# Altium PCB eZlo_Radar.PcbDoc
Units mm, origin at the board's own origin, x right, y up, seen from the top; angles counter-clockwise.
Board outline 38 x 11.5 mm, 4 copper layers (Top Layer, Power, GND, Bottom Layer), stack 1.626 mm thick; 37 components, 24 nets, 151 pads, 70 vias.
Unrouted connection lines stored in the file: 7.
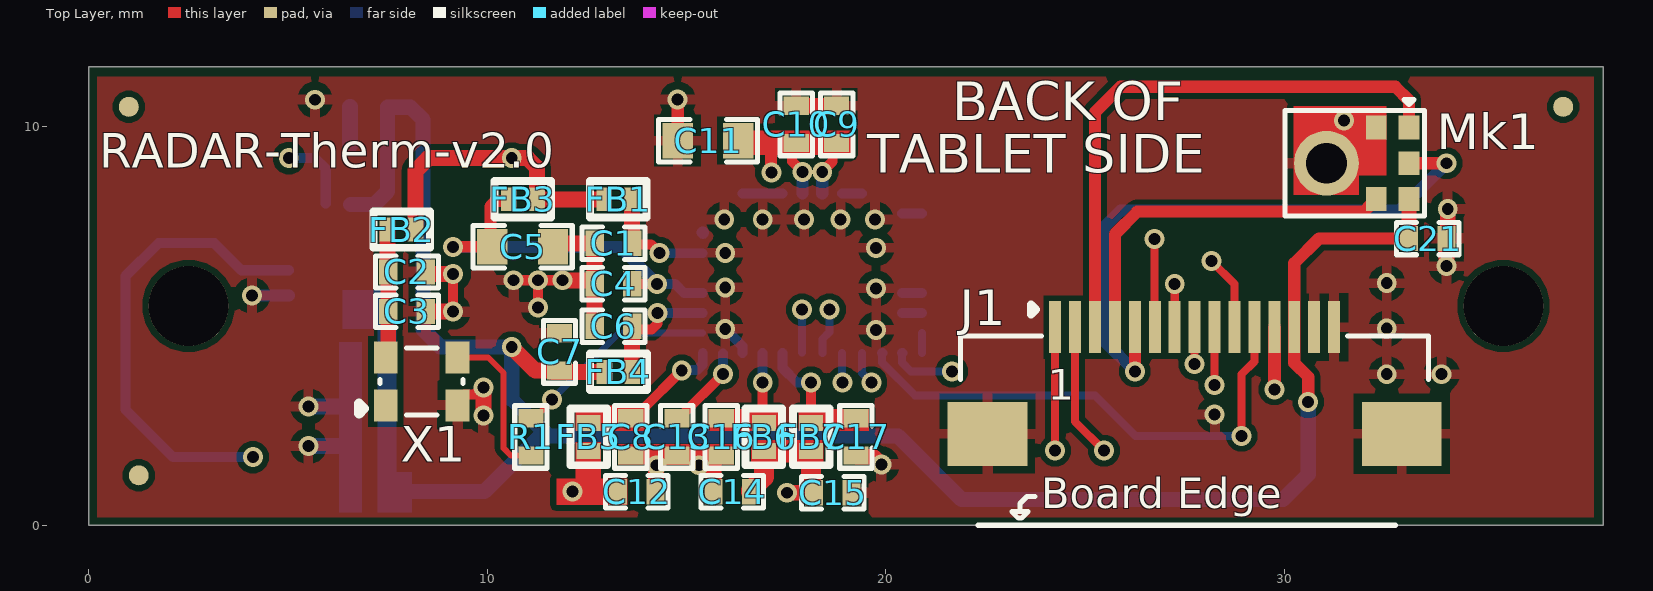
[diagram p0: Top Layer view]
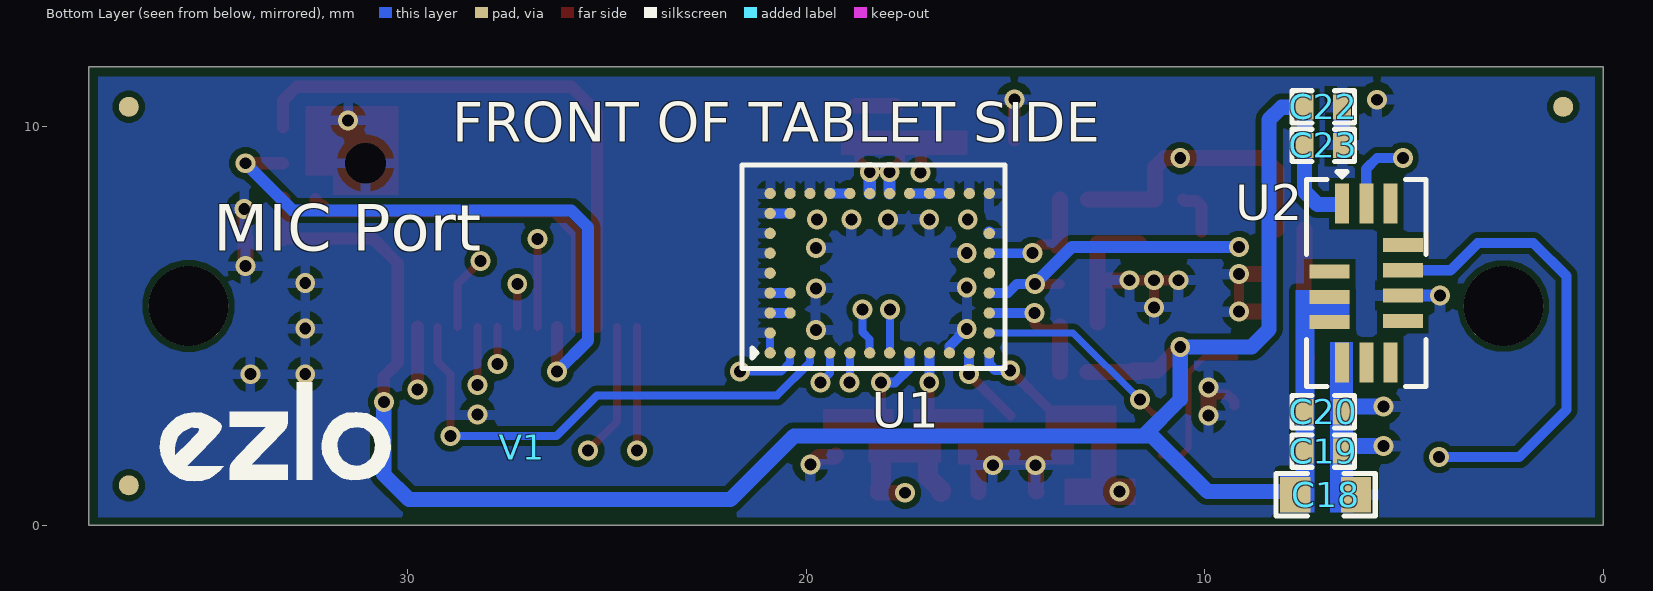
[diagram p1: Bottom Layer view, seen from below]
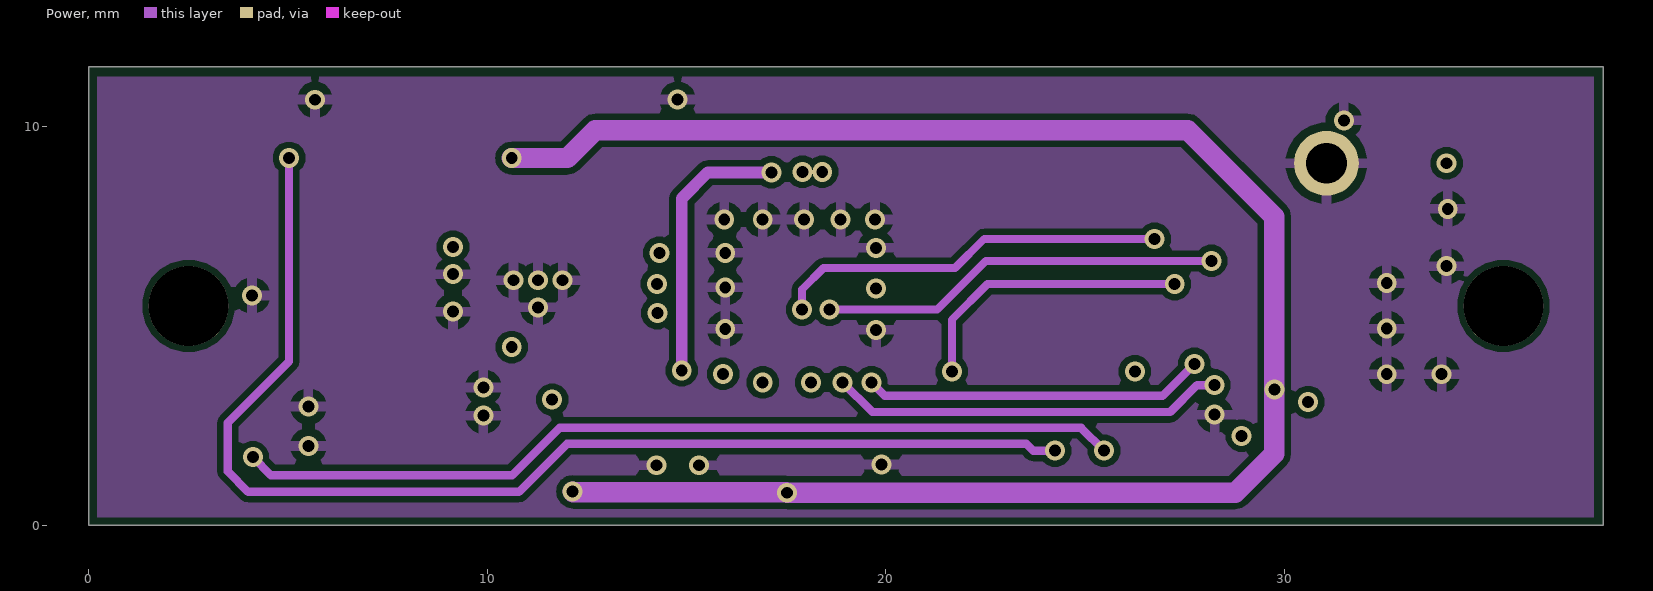
[diagram p2: Power]
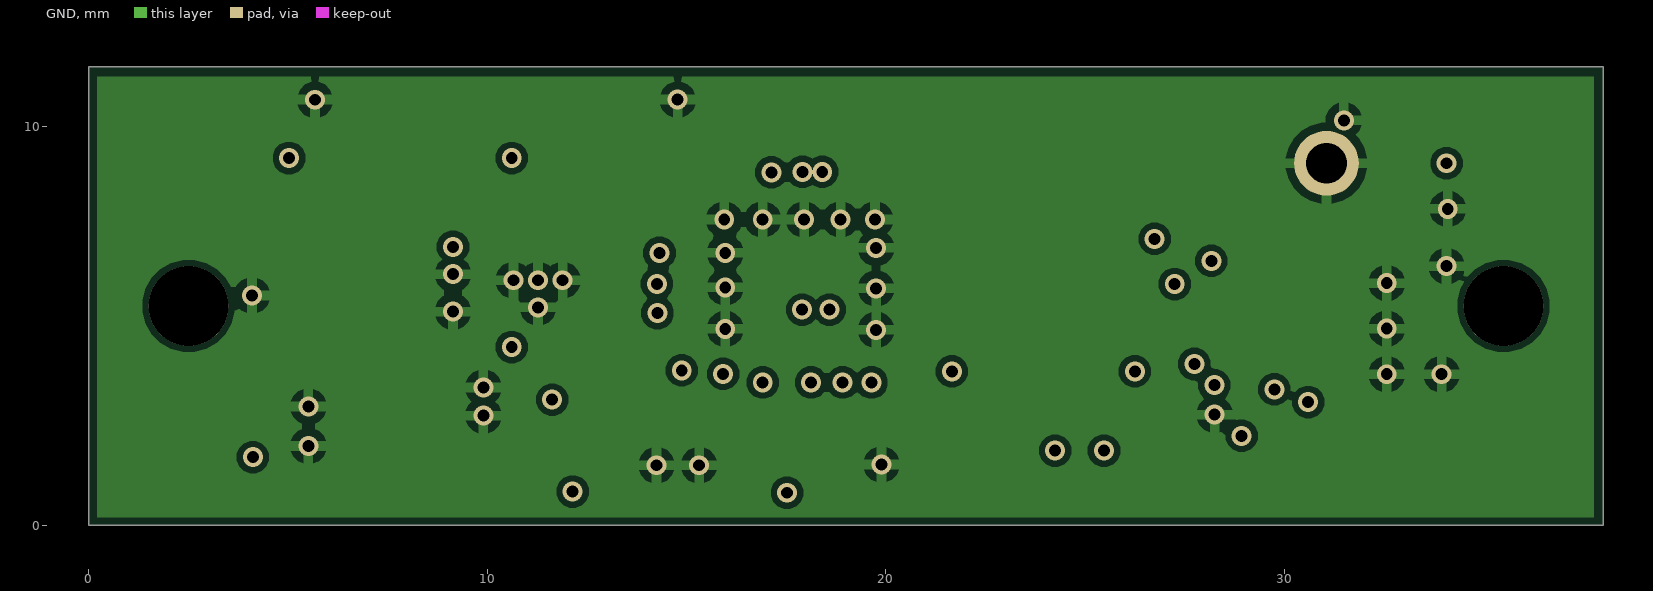
[diagram p3: GND]
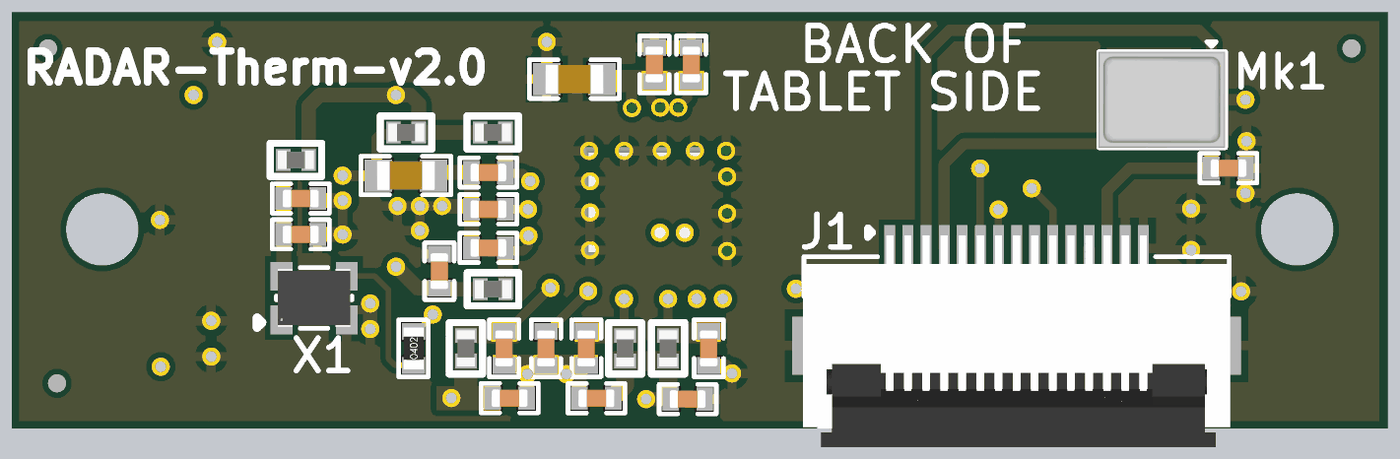
[diagram p4: 3D render of the assembled board from above, using the file's embedded part models]
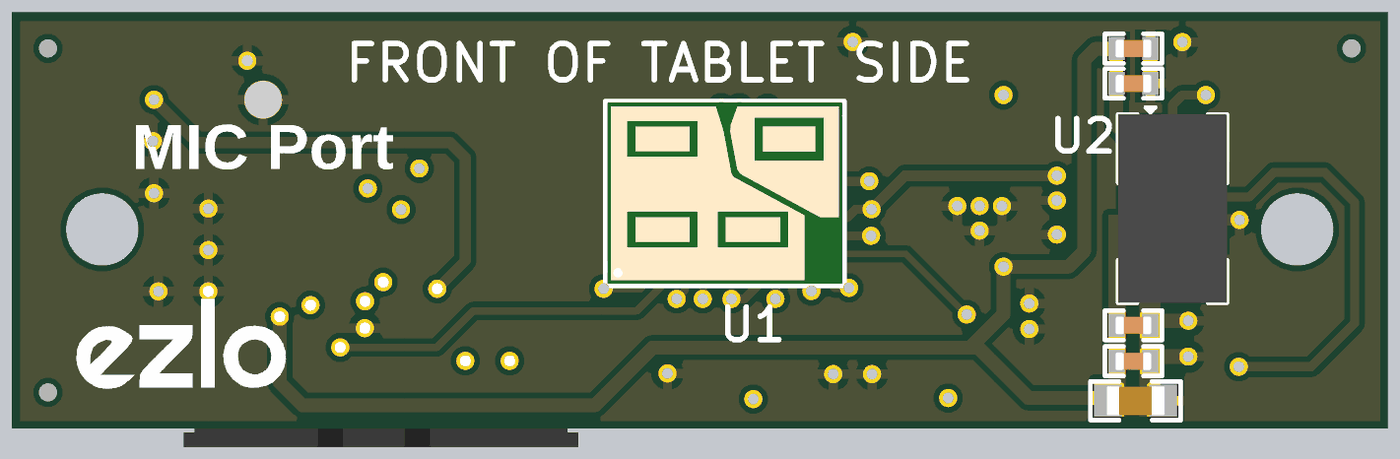
[diagram p5: 3D render of the assembled board from below, using the file's embedded part models]

## Layer stack, top to bottom
Top Solder: solder mask 0.01, Solder Resist, Dk 3.3
Top Layer: signal copper 0.035
Dielectric 2: prepreg 0.2104, PP-006, Dk 4.6
Power: signal copper 0.035
Dielectric 1: core 1.065, FR-4, Dk 4.6
GND: signal copper 0.035
Dielectric 3: prepreg 0.2104, PP-006, Dk 4.6
Bottom Layer: signal copper 0.035
Bottom Solder: solder mask 0.01, Solder Resist, Dk 3.3

## Board outline
0,0 0,11.5 38,11.5 38,0

## Design rules (kind name [scope] priority, off if disabled: settings)
Clearance [All] p1: gap=0.152 ignorepadtopadclearanceinfootprint=FALSE except(0.102: Arc-SMDPad Track-SMDPad SMDPad-SMDPad)
ComponentClearance [All] p1: gap=0 collisioncheckmode=3 verticalgap=0 showdistances=FALSE
HoleSize [All] p1: absolutevalues=TRUE maxlimit=25.4 minlimit=0.025 maxpercent=80.000 minpercent=20.000
HoleToHoleClearance [All] p1: gap=0 allowstackedmicrovias=TRUE
MinimumSolderMaskSliver [All] p1: minsoldermaskwidth=0
PlaneConnect [All] p1: planeconnectstyle=Direct reliefexpansion=0.508 reliefentries=4 reliefconductorwidth=0.254 reliefairgap=0.254
PolygonConnect [All] p1: connectstyle=Relief reliefconductorwidth=0.254 reliefentries=4 polygonreliefangle="90 Angle" airgapwidth=0.203
RoutingVias [All] p1: holewidth=0.3 width=0.6 viastyle="Through Hole" minholewidth=0.2 minwidth=0.45 maxholewidth=0.3 maxwidth=0.6
SilkToSilkClearance [All] p1: silktosilkclearance=0
SilkToSolderMaskClearance [IsPad] p1: minsilkscreentomaskgap=0 clearancetoexposedcopper=TRUE
SolderMaskExpansion [All] p1: expansion=0 istentingtop=FALSE soldermaskfromhole=TRUE
Width [All] p1: maxlimit=0.508 minlimit=0.1 preferedwidth=0.4 minimp=50.000000 maximp=50.000000 favimp=50.000000
23 further rules are at their usual default settings.

## Classes and differential pairs
component class Radar-Sensor: C1 C2 C3 C4 C5 C6 C7 C8 C9 C10 C11 C12 C13 C14 C15 C16 C17 C18 C19 C20 C21 C22 C23 FB1 FB2 FB3 FB4 FB5 FB6 FB7 J1 Mk1 R1 U1 X1

## Components (designator, comment, footprint, x,y, rotation, side; value= is the part's Value field where it differs from the comment)
C1 "1uF" Cap-0402 13.163,7.074 r180 top locked
C2 "1uF" Cap-0402 7.982,6.354 r180 top locked
C3 "10nF" Cap-0402 7.982,5.363 r180 top locked
C4 "1uF" Cap-0402 13.163,6.058 r180 top locked
C5 "22uF" Cap-0603 10.886,6.989 r0 top locked
C6 "1uF" Cap-0402 13.163,4.991 r180 top locked
C7 "10uF" Cap-0402 11.81,4.349 r90 top locked
C8 "1uF" Cap-0402 13.598,2.215 r270 top locked
C9 "1uF" Cap-0402 18.764,10.058 r90 top locked
C10 "1uF" Cap-0402 17.748,10.058 r90 top locked
C11 "22uF" Cap-0603 15.538,9.652 r180 top locked
C12 "10uF" Cap-0402 13.749,0.84 r0 top locked
C13 "0.47uF" Cap-0402 14.756,2.215 r270 top locked
C14 "10uF" Cap-0402 16.146,0.837 r180 top locked
C15 "10uF" Cap-0402 18.666,0.814 r0 top locked
C16 "0.1uF" Cap-0402 15.868,2.215 r270 top locked
C17 "1uF" Cap-0402 19.249,2.215 r270 top locked
C18 "22uF" Cap-0603 6.962,0.767 r0 bottom
C19 "10uF" Cap-0402 7.022,1.86 r0 bottom
C20 "0.1uF" Cap-0402 7.022,2.85 r0 bottom
C21 "0.1uF" Cap-0402 33.602,7.194 r0 top locked
C22 "1uF" Cap-0402 7.022,10.496 r180 bottom locked
C23 "0.1uF" Cap-0402 7.022,9.53 r180 bottom locked
FB1 "100MHz" IND-0402 13.283,8.179 r180 top locked
FB2 "100MHz" IND-0402 7.847,7.42 r180 top locked
FB3 "100MHz" IND-0402 10.89,8.179 r0 top locked
FB4 "100MHz" IND-0402 13.29,3.848 r180 top locked
FB5 "100MHz" IND-0402 12.541,2.215 r270 top locked
FB6 "100MHz" IND-0402 16.939,2.215 r270 top locked
FB7 "100MHz" IND-0402 18.125,2.215 r270 top locked
J1 "AFC01-S15FCC-00" AFC01-S15FCC-00 27.75,3.63 r0 top locked
Mk1 "ICS-43434" ICS-43434 31.76,9.084 r270 top locked
R1 "150R" Res-0402 11.093,2.215 r90 top locked
U1 "BGT60TR13CE6327XUMA1" pg-vf2bga-40 18.154,6.325 r180 bottom locked
U2 "PAJ7620U2" PAJ7620U2 5.942,6.076 r90 bottom
V1 "EZLO_LOGO" "Logo Ezlo_S" 27.126,1.961 r0 bottom locked
X1 "80MHz" KC2016K 8.35,3.607 r0 top locked

## Footprints (in the part's own frame and the unit in brackets; to place one, negate y for a bottom-side part, rotate by r counter-clockwise, add the part's x,y. Pads: shape width x height; smd on the part's side, far side on the other; paste and mask are expansions set on the pad)
AFC01-S15FCC-00 [mm]
  rect 0.3x1.3 smd: 1(-3.5,1.34) 2(-3,1.34) 3(-2.5,1.34) 4(-2,1.34) 5(-1.5,1.34) 6(-1,1.34) 7(-0.5,1.34) 8(0,1.34) 9(0.5,1.34) 10(1,1.34) 11(1.5,1.34) 12(2,1.34) 13(2.5,1.34) 14(3,1.34) 15(3.5,1.34)
  rect 2x1.6 smd: MP1(-5.2,-1.34) MP2(5.2,-1.34)
  silkscreen extent -5.87,-3.63 5.87,1.91, body extent -5.9,-4.14 5.9,1.71, height 2.11
Cap-0402 [mil]
  rect 18x25 smd mask+2.36: 1(-18.5,0) 2(18.5,0)
  silkscreen extent -31,-16 31,16, body extent -20,-10 20,10, height 19
Cap-0603 [mil]
  rect 30x35 smd mask+2.36: 1(-30,0) 2(30,0)
  silkscreen extent -49,-21 49,21, body extent -32,-16 31,16, height 34
ICS-43434 [mm]
  rect 0.6x0.522 smd paste-0.05: 1(-0.9,1.372) 2(-0.9,0.55) 4(0.9,0.55) 5(0.9,1.372) 6(0,1.372)
  rect 0.1x0.1 smd paste-1 mask+0: 3(-0.015,-1.372)
  round 1.625 / inner round 1.625 / far side round 0 hole 1.025: 3(0,-0.702)
  silkscreen extent -1.6,-1.74 1.33,1.76, body extent -1.33,-1.75 1.33,1.75, height 0.98
IND-0402 [mm]
  rect 0.4x0.6 smd: 1(-0.35,0) 2(0.35,0)
  silkscreen extent -0.71,-0.46 0.71,0.46, body extent -0.5,-0.25 0.5,0.25, height 0.25
KC2016K [mm]
  rect 0.6x0.8 smd: 1(-0.9,-0.6) 2(0.9,-0.6) 3(0.9,0.6) 4(-0.9,0.6)
  silkscreen extent -1.57,-0.84 1.04,0.84, body extent -1,-0.8 1,0.8, height 0.81
"Logo Ezlo_S" [mm]
  silkscreen extent 3.3,-1.62 9.09,0.86
PAJ7620U2 [mm]
  rect 1x0.352 smd: 1(1.994,0.61) 2(1.994,0) 3(1.994,-0.61) 8(-1.994,-0.61) 9(-1.994,0) 10(-1.994,0.61)
  rect 0.352x1 smd: 4(0.957,-0.92) 5(0.322,-0.92) 6(-0.313,-0.92) 7(-0.948,-0.92) 11(-0.983,0.92) 12(-0.348,0.92) 13(0.287,0.92)
  silkscreen extent -2.6,-1.5 2.79,1.5, body extent -2.6,-1.5 2.6,1.5, height 1.92
pg-vf2bga-40 [mm]
  round 0.285 smd: A1(-2.75,-2) A2(-2.75,-1.5) A3(-2.75,-1) A4(-2.75,-0.5) A5(-2.75,0) A6(-2.75,0.5) A7(-2.75,1) A8(-2.75,1.5) A9(-2.75,2) B1(-2.25,-2) B3(-2.25,-1) B4(-2.25,-0.5) B8(-2.25,1.5) B9(-2.25,2) C1(-1.75,-2) C9(-1.75,2) D1(-1.25,-2) D9(-1.25,2) E1(-0.75,-2) E9(-0.75,2) F1(-0.25,-2) F9(-0.25,2) G1(0.25,-2) G9(0.25,2) H1(0.75,-2) H9(0.75,2) J1(1.25,-2) J9(1.25,2) K1(1.75,-2) K9(1.75,2) L1(2.25,-2) L9(2.25,2) M1(2.75,-2) M2(2.75,-1.5) M3(2.75,-1) M4(2.75,-0.5) M5(2.75,0) M6(2.75,0.5) M7(2.75,1) M9(2.75,2)
  silkscreen extent -3.45,-2.39 3.15,2.72, body extent -3.4,-2.32 3.1,2.68, height 0.9
Res-0402 [mil]
  rect 18x25 smd mask+2.17: 1(-18.5,0) 2(18.5,0)
  silkscreen extent -32,-17 32,16, body extent -23,-11 23,11, height 16

## Part data
C1 C2 C4 C6 C8 C9 C10 C17 C22: library part CC0402KRX5R6BB105, "CAP CER 1UF 10V X5R 0402", Case Code (Imperial)=0402, Case Code (Metric)=1005, Dielectric=X5R, LCSC Part Number=C106254, Manufacturer=Yageo, Max Operating Temperature=85°C, Min Operating Temperature=-55°C, Package Quantity=1, Resistor Type=Ceramic, Supplier Part Number 1=603-CC402KRX5R6BB105, Tolerance=10%, Voltage Rating=10V, Capacitance=1uF, Case/Package=0402, Category="Ceramic Capacitors", ComponentLink1Description=https://datasheet.ciiva.com/176/upy-gphc-x5r-4v-to-50v-12-176704.pdf?src-supplier=Digi-Key, ComponentLink1URL=https://datasheet.ciiva.com/176/upy-gphc-x5r-4v-to-50v-12-176704.pdf?src-supplier=Digi-Key, ComponentLink2Description=https://datasheet.ciiva.com/176/mlccorderingcode-176705.pdf?src-supplier=Digi-Key, ComponentLink2URL=https://datasheet.ciiva.com/176/mlccorderingcode-176705.pdf?src-supplier=Digi-Key, ComponentLink3Description=https://datasheet.ciiva.com/176/mlccorderingcode-176706.pdf?src-supplier=Digi-Key, ComponentLink3URL=https://datasheet.ciiva.com/176/mlccorderingcode-176706.pdf?src-supplier=Digi-Key, Construction=Flat, Depth=0.5mm, Dissipation Factor=15%, Halogen Free="Halogen Free", Height=0.5mm, Lead Free="Lead Free", Length=1mm, Manufacturer Part Number=CC0402KRX5R6BB105, Mount="Surface Mount", Number of Pins=2, Packaging="Tape and Reel", Pricing 1="1=0.11000, 10=0.05500, 50=0.05500, 100=0.03300, 500=0.02700, 1000=0.02200, 2500=0.02100, 10000=0.01800 (USD)", Radiation Hardening=No, REACH SVHC="No SVHC", RoHS=Yes, RoHS Compliant=Yes, Series=CC, Stock 1=6711367, Supplier 1=Mouser, Termination=SMD/SMT, Thickness=0.022inch, Voltage Rating (DC)=10V, Width=0.02inch
C3: library part CC0402KRX7R8BB103, "CAP CER 10000PF 25V X7R 0402", Case Code (Imperial)=0402, Case Code (Metric)=1005, Dielectric=X7R, LCSC Part Number=C327025, Manufacturer=Yageo, Max Operating Temperature=125°C, Min Operating Temperature=-55°C, Package Quantity=1, Supplier Part Number 1=311-1337-1-ND, Tolerance=10%, Voltage Rating=25V, Capacitance=10nF, Case/Package=0402, ComponentLink1Description=http://www.yageo.com/documents/recent/UPY-GPHC_X7R_6.3V-to-50V_18.pdf?src-supplier=Digi-Key, ComponentLink1URL=http://www.yageo.com/documents/recent/UPY-GPHC_X7R_6.3V-to-50V_18.pdf?src-supplier=Digi-Key, ComponentLink2Description=https://www.verical.com/server-webapp/html/getDatasheet?partID=375418&src-supplier=Verical, ComponentLink2URL=https://www.verical.com/server-webapp/html/getDatasheet?partID=375418&src-supplier=Verical, ComponentLink3Description=http://www.yageo.com/documents/recent/UPY-GPHC_X7R_6.3V-to-50V_8.pdf?src-supplier=Avnet, ComponentLink3URL=http://www.yageo.com/documents/recent/UPY-GPHC_X7R_6.3V-to-50V_8.pdf?src-supplier=Avnet, ComponentLink4Description=https://4donline.ihs.com/images/VipMasterIC/IC/YAGO/YAGO-S-A0003557223/YAGO-S-A0003557223-1.pdf?hkey=52A5661711E402568146F3353EA87419&src-supplier=Element14, ComponentLink4URL=https://4donline.ihs.com/images/VipMasterIC/IC/YAGO/YAGO-S-A0003557223/YAGO-S-A0003557223-1.pdf?hkey=52A5661711E402568146F3353EA87419&src-supplier=Element14, ComponentLink5Description=http://www.farnell.com/datasheets/2167236.pdf?src-supplier=Element14, ComponentLink5URL=http://www.farnell.com/datasheets/2167236.pdf?src-supplier=Element14, ComponentLink6Description=http://www.mouser.com/ds/2/447/Yageo_UPY-GP_NP0_16V-to-50V_9-358835.pdf?src-supplier=Mouser, ComponentLink6URL=http://www.mouser.com/ds/2/447/Yageo_UPY-GP_NP0_16V-to-50V_9-358835.pdf?src-supplier=Mouser, Composition=Ceramic, Depth=0.5mm, Halogen Free="Halogen Free", Height=0.5mm, Lead Free="Lead Free", Length=1mm, Manufacturer Part Number=CC0402KRX7R8BB103, Mount="Surface Mount", Packaging="Tape and Reel", Pricing 1="1=0.1, 10=0.021, 100=0.0093, 500=0.00666, 1000=0.00523, 2500=0.00476, 5000=0.00438 (USD)", Radiation Hardening=No, REACH SVHC=Unknown, Stock 1=0, Supplier 1=Digi-Key, Termination=SMD/SMT, Thickness=0.022inch, Voltage Rating (DC)=25V, Width=0.02inch
C5 C11 C18: library part CC0603MRX5R6BB226, "CAP CER 22UF 10V X5R 0603", Case Code (Imperial)=0603, Case Code (Metric)=1608, Dielectric=X5R, LCSC Part Number=C109447, Manufacturer=Yageo, Max Operating Temperature=85°C, Min Operating Temperature=-55°C, Package Quantity=4000, Supplier Part Number 1=311-1819-1-ND, Tolerance=20%, Voltage Rating=10V, Capacitance=22uF, Case/Package=0603, Category="Ceramic Capacitors", ComponentLink1Description=http://www.mouser.com/ds/2/447/Yageo_UPY-GP_NP0_16V-to-50V_9-358835.pdf?src-supplier=Mouser, ComponentLink1URL=http://www.mouser.com/ds/2/447/Yageo_UPY-GP_NP0_16V-to-50V_9-358835.pdf?src-supplier=Mouser, ComponentLink2Description=http://www.yageo.com/documents/recent/UPY-GPHC_X5R_4V-to-50V_25.pdf?src-supplier=Digi-Key, ComponentLink2URL=http://www.yageo.com/documents/recent/UPY-GPHC_X5R_4V-to-50V_25.pdf?src-supplier=Digi-Key, Halogen Free="Halogen Free", Height=0.8mm, Lead Free="Lead Free", Length=0.063inch, Manufacturer Part Number=CC0603MRX5R6BB226, Mount="Surface Mount", Packaging="Tape and Reel", Pricing 1="1=0.68000, 10=0.48000, 50=0.36300, 100=0.31610, 500=0.23416, 1000=0.19903 (USD)", RoHS=Yes, RoHS Compliant=Yes, Stock 1=19628, Supplier 1=Digi-Key, Termination=SMD/SMT, Thickness=0.035inch, Voltage Rating (DC)=10V, Weight=7.1E-05oz, Width=0.8mm
C7 C12 C14 C15 C19: library part CL05A106MP5NUNC, "CAP CER 10UF 10V X5R 0402", Case Code (Imperial)=0402, Case Code (Metric)=1005, Dielectric=X5R, LCSC Part Number=C315248, Manufacturer=Samsung, Max Operating Temperature=85°C, Min Operating Temperature=-55°C, Package Quantity=1, Tolerance=20%, Voltage Rating=10V, Capacitance=10uF, Case/Package=0402, Category="Ceramic Capacitors", ComponentLink1Description=https://datasheet.ciiva.com/25721/cl05a106mp5nunc-25721584.pdf?src-supplier=Digi-Key, ComponentLink1URL=https://datasheet.ciiva.com/25721/cl05a106mp5nunc-25721584.pdf?src-supplier=Digi-Key, ComponentLink2Description=https://datasheet.ciiva.com/26838/getdatasheetpartid-745310-26838170.pdf?src-supplier=Verical, ComponentLink2URL=https://datasheet.ciiva.com/26838/getdatasheetpartid-745310-26838170.pdf?src-supplier=Verical, Construction=Flat, Contact Plating=Tin, Depth=0.5mm, Item Type=Capacitor, Lead Free="Lead Free", Length=1mm, Manufacturer Part Number=CL05A106MP5NUNC, Mount="Surface Mount", Packaging="Tape and Reel", Pricing 1="10000=0.02537 (USD)", Radiation Hardening=No, RoHS=Yes, RoHS Compliant=Yes, Series=CL, Stock 1=1729850, Supplier 1=Avnet, Supplier Part Number 1=CL05A106MP5NUNC, Termination=Wraparound, Thickness=0.028inch, Width=0.02inch
C13: library part UMK105ABJ474KV-F, "CAP CER 0.47UF 50V X5R 0402", Capacitance=470nF, Case Code (Imperial)=0402, Case Code (Metric)=1005, Dielectric=X5R, LCSC Part Number=C386109, Manufacturer="Taiyo Yuden", Max Operating Temperature=85°C, Min Operating Temperature=-55°C, Package Quantity=10000, Supplier Part Number 1=587-3497-1-ND, Tolerance=10%, Voltage Rating=50V, Case/Package=0402, Category="Ceramic Capacitors", ComponentLink1Description=https://datasheet.ciiva.com/30249/584umk105abj474kv-f-30249824.pdf?src-supplier=Onlinecomponents.com, ComponentLink1URL=https://datasheet.ciiva.com/30249/584umk105abj474kv-f-30249824.pdf?src-supplier=Onlinecomponents.com, ComponentLink2Description=https://datasheet.ciiva.com/24370/10umk105abj474kv-f-24370678.pdf?src-supplier=Onlinecomponents.com, ComponentLink2URL=https://datasheet.ciiva.com/24370/10umk105abj474kv-f-24370678.pdf?src-supplier=Onlinecomponents.com, ComponentLink3Description=https://datasheet.ciiva.com/18697/mlcc-all-e-18697429.pdf?src-supplier=Digi-Key, ComponentLink3URL=https://datasheet.ciiva.com/18697/mlcc-all-e-18697429.pdf?src-supplier=Digi-Key, ComponentLink4Description=https://datasheet.ciiva.com/18697/mlcc-all-e-18697430.pdf?src-supplier=Digi-Key, ComponentLink4URL=https://datasheet.ciiva.com/18697/mlcc-all-e-18697430.pdf?src-supplier=Digi-Key, ComponentLink5Description=https://datasheet.ciiva.com/18697/mlcc-all-e-18697431.pdf?src-supplier=Digi-Key, ComponentLink5URL=https://datasheet.ciiva.com/18697/mlcc-all-e-18697431.pdf?src-supplier=Digi-Key, Height=0.5mm, Item Type=Capacitor, Lead Free="Lead Free", Length=0.039inch, Manufacturer Part Number=UMK105ABJ474KV-F, Mount="Surface Mount", Packaging="Tape and Reel", Pricing 1="1=0.24000, 10=0.16100, 50=0.09680, 100=0.08170, 500=0.05592, 1000=0.04946, 2500=0.04731, 5000=0.04301 (USD)", RoHS=Yes, RoHS Compliant=Yes, Stock 1=145003, Supplier 1=Digi-Key, Termination=SMD/SMT, Thickness=0.022inch, Voltage Rating (DC)=50V, Width=0.02inch
C16 C20 C21 C23: library part CL05B104KB54PNC, "CAP CER 0.1UF 50V X7R 0402", LCSC Part Number=C307331, Manufacturer=Samsung, Supplier Part Number 1=1276-CL05B104KB54PNCDKR-ND, Manufacturer Part Number=CL05B104KB54PNC, Pricing 1="1=0.1, 10=0.067, 50=0.0366, 100=0.0299, 500=0.02138, 1000=0.01681, 2500=0.01528, 5000=0.01406 (USD)", Stock 1=8594, Supplier 1=Digi-Key
FB1 FB2 FB3 FB4 FB5 FB6 FB7: library part BLM15PD121SN1D, "FERRITE BEAD 120 OHM 0402 1LN", Case Code (Imperial)=0402, Case Code (Metric)=1005, Current Rating=1.3A, DC Resistance (DCR)=90mR, LCSC Part Number=C76891, Manufacturer=Murata, Max Operating Temperature=125°C, Min Operating Temperature=-55°C, Package Quantity=1, Tolerance=25%, Case/Package=0402, Category="Ferrite Beads and Chips", ComponentLink1Description=https://datasheet.ciiva.com/11800/0900766b811b5866-11800860.pdf?src-supplier=RSComponents, ComponentLink1URL=https://datasheet.ciiva.com/11800/0900766b811b5866-11800860.pdf?src-supplier=RSComponents, ComponentLink2Description=https://datasheet.ciiva.com/18093/getdatasheetpartid-195858-18093157.pdf?src-supplier=Verical, ComponentLink2URL=https://datasheet.ciiva.com/18093/getdatasheetpartid-195858-18093157.pdf?src-supplier=Verical, ComponentLink3Description=https://datasheet.ciiva.com/41425/001171686-da-01-en-chip-drossel0402-120r-1300ma-1-0x0-5mm-41425776.pdf?src-supplier=Conrad, ComponentLink3URL=https://datasheet.ciiva.com/41425/001171686-da-01-en-chip-drossel0402-120r-1300ma-1-0x0-5mm-41425776.pdf?src-supplier=Conrad, ComponentLink4Description=https://datasheet.ciiva.com/41449/001172205-da-01-en-drossel-0402-120r-11-0x0-5mm-10000st-41449495.pdf?src-supplier=Conrad, ComponentLink4URL=https://datasheet.ciiva.com/41449/001172205-da-01-en-drossel-0402-120r-11-0x0-5mm-10000st-41449495.pdf?src-supplier=Conrad, ComponentLink5Description=https://datasheet.ciiva.com/1012/l0110e-1012435.pdf?src-supplier=Digi-Key, ComponentLink5URL=https://datasheet.ciiva.com/1012/l0110e-1012435.pdf?src-supplier=Digi-Key, ComponentLink6Description=https://datasheet.ciiva.com/1012/l0110e-1012434.pdf?src-supplier=Digi-Key, ComponentLink6URL=https://datasheet.ciiva.com/1012/l0110e-1012434.pdf?src-supplier=Digi-Key, ComponentLink7Description=https://datasheet.ciiva.com/1012/l0110e-1012436.pdf?src-supplier=Digi-Key, ComponentLink7URL=https://datasheet.ciiva.com/1012/l0110e-1012436.pdf?src-supplier=Digi-Key, Core Material=Ferrite, DC Current=1.3A, DC Resistance-Max=90mR, Depth=0.55mm, Height=0.5mm, Impedance=120R, Item Type="Ferrite Bead", Lead Free="Lead Free", Length=1mm, Manufacturer Part Number=BLM15PD121SN1D, Material=Steel,Ferrite, Max Current Rating=1.3A, Max DC Current=1.3A, Military Standard=Not, Number of Circuits=1, Number of Lines=1, Number of Pins=2, Packaging="Tape and Reel", Pricing 1="10000=0.03238, 20000=0.03063, 40000=0.02888, 60000=0.02713, 80000=0.02538, 100000=0.02363, 1000000=0.02188 (USD)", Radiation Hardening=No, Reach SVHC Compliant=Yes, RoHS=Yes, RoHS Compliant=Yes, Series=BLM15PD, Stock 1=300000, Supplier 1=Avnet, Supplier Part Number 1=BLM15PD121SN1D, Termination=SMD/SMT, Test Frequency=100MHz, Width=0.5mm
J1: "Clamshell 15 Bottom Contact Surface Mount 0.5mm SMD,P=0.5mm FFC/FPC Connectors ROHS", LCSC Part Number=C262271, Manufacturer=JUSHUO, Package=SMD,P=0.5mm, ComponentLink1Description=LCSC, ComponentLink1URL=https://www.lcsc.com/product-detail/FFC-FPC-Connectors_JUSHUO-AFC01-S15FCC-00_C262271.html, Item Type="FPC Connector", Manufacturer Part Number=AFC01-S15FCC-00
Mk1: "Mic Omni-Directional -26dB 3.63V Rectangular Solder Pad T/R", Manufacturer="TDK InvenSense", Operating Supply Current=550uA, Supplier Part Number=2182235, Category=Microphones, ComponentLink1Description=http://www.farnell.com/datasheets/2632666.pdf?src-supplier=Farnell, ComponentLink1URL=http://www.farnell.com/datasheets/2632666.pdf?src-supplier=Farnell, ComponentLink2Description=https://www.invensense.com/wp-content/uploads/2016/02/DS-000069-ICS-43434-v1.2.pdf?src-supplier=Digi-Key, ComponentLink2URL=https://www.invensense.com/wp-content/uploads/2016/02/DS-000069-ICS-43434-v1.2.pdf?src-supplier=Digi-Key, ComponentLink3Description=https://www.invensense.com/wp-content/uploads/2016/02/PB-000018-ICS-43434-v1.1.pdf?src-supplier=Digi-Key, ComponentLink3URL=https://www.invensense.com/wp-content/uploads/2016/02/PB-000018-ICS-43434-v1.1.pdf?src-supplier=Digi-Key, ComponentLink4Description=http://www.farnell.com/datasheets/2632666.pdf?src-supplier=Element14, ComponentLink4URL=http://www.farnell.com/datasheets/2632666.pdf?src-supplier=Element14, ComponentLink5Description=http://www.farnell.com/datasheets/2632666.pdf?src-supplier=Newark, ComponentLink5URL=http://www.farnell.com/datasheets/2632666.pdf?src-supplier=Newark, Direction=Omnidirectional, Item Type=MICROPHONE, Manufacturer Part Number=ICS-43434, Packaging="Cut Tape", Pricing="5=2.686, 100=2.142, 1000=2.086, 2500=2.032, 5000=1.984 (GBP)", RoHS=No, RoHS Compliant=No, Series=ICS-43434, Shape=Rectangular, Stock=355, Supplier=Rs, Termination=Solder
R1: library part ERJ-2GEJ151X, "RES SMD 150 OHM 5% 1/10W 0402", Case Code (Imperial)=0402, Case Code (Metric)=1005, LCSC Part Number=C412976, Manufacturer=Panasonic, Max Operating Temperature=155°C, Max Power Dissipation=100mW, Min Operating Temperature=-55°C, Package Quantity=10000, Ratings=AEC-Q200, Resistance Tolerance=5%, Resistor Type="Thick Film", Supplier Part Number 1=65T8254, Temperature Coefficient=200ppm/°C, Voltage Rating=50V, Case/Package=0402, Category="Chip SMD Resistors", ComponentLink1Description=https://datasheet.ciiva.com/11821/0900766b80f806dd-11821182.pdf?src-supplier=RSComponents, ComponentLink1URL=https://datasheet.ciiva.com/11821/0900766b80f806dd-11821182.pdf?src-supplier=RSComponents, ComponentLink2Description=https://datasheet.ciiva.com/43460/1500035-43460367.pdf?src-supplier=Farnell, ComponentLink2URL=https://datasheet.ciiva.com/43460/1500035-43460367.pdf?src-supplier=Farnell, ComponentLink3Description=https://datasheet.ciiva.com/6082/1500035-6082105.pdf?src-supplier=Farnell, ComponentLink3URL=https://datasheet.ciiva.com/6082/1500035-6082105.pdf?src-supplier=Farnell, ComponentLink4Description=https://datasheet.ciiva.com/46377/1500035-46377070.pdf?src-supplier=Element14, ComponentLink4URL=https://datasheet.ciiva.com/46377/1500035-46377070.pdf?src-supplier=Element14, ComponentLink5Description=https://datasheet.ciiva.com/28568/1678796-28568939.pdf?src-supplier=Element14, ComponentLink5URL=https://datasheet.ciiva.com/28568/1678796-28568939.pdf?src-supplier=Element14, ComponentLink6Description=https://datasheet.ciiva.com/16773/70260739-16773454.pdf?src-supplier=Allied+Electronics, ComponentLink6URL=https://datasheet.ciiva.com/16773/70260739-16773454.pdf?src-supplier=Allied+Electronics, ComponentLink7Description=https://datasheet.ciiva.com/30178/4aoa0000ce1-30178453.pdf?src-supplier=Onlinecomponents.com, ComponentLink7URL=https://datasheet.ciiva.com/30178/4aoa0000ce1-30178453.pdf?src-supplier=Onlinecomponents.com, Construction=Rectangular, Contact Plating=Tin, Depth=0.5mm, Features="Automotive AEC-Q200", Height=0.35mm, Item Type=Resistor, Lead Free="Lead Free", Length=1mm, Manufacturer Part Number=ERJ-2GEJ151X, Military Standard=Not, Mount="Surface Mount", Number of Terminations=2, Packaging="Tape and Reel", Power Rating=100mW, Pricing 1="1=0.10100, 25=0.03200, 100=0.01300, 250=0.01100, 500=0.00900, 1000=0.00500 (USD)", Radiation Hardening=No, Reach SVHC Compliant=Yes, Resistance=150R, RoHS=Yes, RoHS Compliant=Yes, Series=ERJ, Stock 1=19191, Supplier 1=Avnet, Technology="THICK FILM", Termination=SMD/SMT, Tolerance=5%, Voltage Rating (DC)=50V, Weight=2.8E-05oz, Width=0.5mm, Working Voltage=50V
U1: "Rf Transceiver PG-VF2BGA-40", LCSC Part Number=C3606641, Manufacturer=Infineon, Supplier Part Number 1=25AK0242, Category="RF Receivers, Transceivers", ComponentLink1Description=LCSC, ComponentLink1URL=https://www.lcsc.com/product-detail/RF-Transceiver-ICs_Infineon-Technologies-BGT60TR13CE6327XUMA1_C3606641.html, Item Type=IC, Manufacturer Part Number=BGT60TR13CE6327XUMA1, Pricing 1="1=20.67000, 10=18.89000, 25=17.50000, 50=16.72000, 100=15.93000, 250=15.16000, 500=14.94000, 1000=14.51000 (USD)", RoHS=No, Stock 1=4397, Supplier 1=Newark
U2: "Integrated Gesture Recognition Sensor with I2C Interface", Manufacturer="PixART Imaging Inc.", Item Type=IC, Manufacturer Part Number=PAJ7620U2
V1: library part "Logo Ezlo_S", Sheetfile=radar.kicad_sch
X1: library part KC2016K80.0000C1GE00, "XTAL OSC XO 80.0000MHZ CMOS SMD", Case/Package=SMD/SMT, Frequency Stability=50ppm, LCSC Part Number=C1988243, Manufacturer="Kyocera AVX", Max Operating Temperature=85°C, Max Supply Current=8mA, Min Operating Temperature=-40°C, Supplier Part Number 1=478-KC2016K80.0000C1GE00CT-ND, Category=Oscillators, ComponentLink1Description=http://www.mouser.com/ds/2/40/clock_k_e-522534.pdf?src-supplier=Mouser, ComponentLink1URL=http://www.mouser.com/ds/2/40/clock_k_e-522534.pdf?src-supplier=Mouser, ComponentLink2Description=http://www.kyocera-crystal.jp/eng/wp-content/uploads/2014/09/pkg_e.pdf?src-supplier=Digi-Key, ComponentLink2URL=http://www.kyocera-crystal.jp/eng/wp-content/uploads/2014/09/pkg_e.pdf?src-supplier=Digi-Key, ComponentLink3Description=http://global.kyocera.com/prdct/electro/product/pdf/clock_k_e.pdf?src-supplier=Digi-Key, ComponentLink3URL=http://global.kyocera.com/prdct/electro/product/pdf/clock_k_e.pdf?src-supplier=Digi-Key, Frequency=80MHz, Height=0.031inch, Item Type=Crystal, Lead Free="Lead Free", Length=0.079inch, Manufacturer Part Number=KC2016K80.0000C1GE00, Mount="Surface Mount", Packaging="Tape and Reel", Pricing 1="1=1.31000, 10=1.25300, 50=1.22440, 100=1.04940, 500=1.02024, 1000=0.85992 (USD)", RoHS=Yes, RoHS Compliant=No, Stock 1=350, Supplier 1=Digi-Key, Width=0.063inch

## Free pads (board coordinates)
  round 2 hole 2 unplated: MH(2.5,5.5) MH(35.5,5.5)
  round 0.5 smd: ""(1,10.5) ""(1.25,1.25) ""(37,10.5)
  round 0.5 smd far side: ""(1,10.5) ""(37,1) ""(37,10.5)

## Via types
v1: diameter 0.5, hole 0.3, Top Layer to Bottom Layer, 70 vias

## Nets (pads, with @x,y where several pads share a name; then routed paths per layer and width w, separated by ;. In a path a pad name is that pad's centre, name@x,y a point inside that pad or via, vN(x,y) a via of type N, cw(c..) or ccw(c..) an arc to the next point about the centre after c; other vN are vias at no path point)
1V8_SENSOR: C12.1 C14.1 C15.1 FB1.2 FB2.1 FB3.2 FB5.2 FB6.2 FB7.2 J1.12 | length 58.4
  Top Layer w0.3: v1(12.14,0.844) 12.142,0.842 12.774,0.842 ; FB5.2@12.522,1.905 12.522,1.018 12.701,0.84 C12.1
  Top Layer w0.33: v1(29.75,3.409) J1.12
  Top Layer w0.4: FB2.1 8.197,8.899 8.51,9.213 v1@10.584,9.213 ; v1(10.611,9.213) 10.612,9.211 11.006,9.211 11.24,8.977 FB3.2 FB1.2 ; v1(17.52,0.814) C15.1 18.196,0.903 C15.1@18.125,0.974
  Top Layer w0.5: C14.1 16.616,0.883 16.939,1.206 FB6.2 ; C15.1@18.125,0.974 FB7.2
  Power w0.508: v1(10.611,9.213) 12.008,9.213 12.707,9.912 27.579,9.912 29.75,7.74 v1(29.75,3.409) 29.75,1.791 28.773,0.814 v1(17.52,0.814) 17.505,0.829 12.155,0.829 v1(12.14,0.844)
3V3_SENSOR: C7.1 C18.2 C19.2 C20.2 C21.1 C22.1 C23.1 FB4.2 J1.13 Mk1.5 U2.1 U2.11 U2.12 | length 51.2
  Top Layer w0.305: v1(30.6,3.09) 30.6,3.722 30.25,4.072 30.25,6.575 30.868,7.194 C21.1
  Top Layer w0.381: C21.1 Mk1.5
  Top Layer w0.4: v1(10.611,4.47) 11.202,3.879 C7.1 ; C7.1@11.639,3.848 FB4.2
  Bottom Layer w0.381: U2.1@6.567,8.049 7.169,8.049 7.492,8.372 C22.1 7.498,10.49 8.069,10.49 8.382,10.177 8.382,4.907 8.819,4.47 v1(10.611,4.47) 10.611,3.16 11.534,2.236 ; C18.2@7.724,0.894 7.775,0.844 9.925,0.844 11.317,2.236 11.534,2.236 ; v1(30.6,3.09) 30.6,1.27 29.971,0.64 21.898,0.64 20.302,2.236 11.534,2.236
BGT_CLK: J1.7 U1.B1 | length 9.9
  Top Layer w0.203: J1.7 v1(27.25,6.051)
  Power w0.2: v1(21.656,3.86) 21.656,5.153 22.554,6.051 v1(27.25,6.051)
  Bottom Layer w0.2: U1.B1 20.404,4.082 20.626,3.86 v1(21.656,3.86)
  Bottom Layer w0.254: U1.B1 U1.B1@20.41,4.319
BGT_CS: J1.6 U1.G1 | length 13.2
  Top Layer w0.203: J1.6@26.745,4.975 v1(26.745,7.186)
  Power w0.2: v1(17.9,5.41) 17.9,5.918 18.434,6.452 21.736,6.452 22.47,7.186 v1(26.745,7.186)
  Bottom Layer w0.2: U1.G1@17.9,4.329 v1(17.9,5.41)
BGT_IRQ: J1.11 U1.C1 | length 12.9
  Top Layer w0.203: v1(28.929,2.241) 28.929,3.789 29.25,4.109 J1.11
  Bottom Layer w0.2: U1.C1 19.904,4.084 20.737,3.251 25.252,3.251 26.262,2.241 v1(28.929,2.241)
  Bottom Layer w0.254: U1.C1 U1.C1@19.91,4.319
BGT_MISO: J1.9 U1.E1 | length 12.1
  Top Layer w0.203: v1(28.244,3.515) 28.25,3.521 J1.9
  Power w0.208: v1(18.916,3.581) 19.66,2.838 27.138,2.838 27.815,3.515 v1(28.244,3.515)
  Bottom Layer w0.203: v1@18.904,3.595 U1.E1
BGT_MOSI: J1.8 U1.D1 | length 10.4
  Top Layer w0.203: v1(27.743,4.044) 27.746,4.048 27.746,4.966 J1.8
  Power w0.208: v1(19.638,3.581) 19.974,3.246 26.945,3.246 v1(27.743,4.044)
  Bottom Layer w0.203: U1.D1 19.404,3.823 v1@19.638,3.59 ; v1(19.638,3.581) v1@19.638,3.59 ; v1@19.638,3.615 v1@19.638,3.59
BGT_RST: J1.10 U1.F1 | length 13.2
  Top Layer w0.203: v1(28.168,6.634) 28.75,6.052 J1.10
  Power w0.2: v1(18.586,5.41) 21.289,5.41 22.512,6.634 v1(28.168,6.634)
  Bottom Layer w0.2: U1.F1 18.404,4.666 18.586,4.848 v1(18.586,5.41)
GND: C1.2 C2.1 C3.1 C4.2 C5.2 C6.2 C7.2 C8.2 C9.2 C10.2 C11.2 C12.2 C13.2 C14.2 C15.2 C16.2 C17.2 C18.1 C19.1 C20.1 C21.2 C22.2 C23.2 J1.14 J1.15 J1.MP1 J1.MP2 Mk1.2 Mk1.3 U1.A1 U1.A2 U1.A3 U1.A4 U1.A5 U1.A6 U1.A7 U1.A8 U1.A9 U1.B3 U1.B4 U1.B8 U1.B9 U1.C9 U1.D9 U1.E9 U1.H9 U1.J9 U1.K1 U1.K9 U1.L9 U1.M7 U1.M9 U2.6 U2.10 X1.2 | length 25.8
  Top Layer w0.254: v1(9.137,5.359) 9.137,5.361 v1(9.137,6.299) ; X1.2 9.25,3.107 9.423,3.28 9.672,3.28 9.846,3.454 v1(9.899,3.454) ; v1(10.655,6.147) v1(11.271,6.147) ; v1(11.271,5.467) v1(11.271,6.147) ; v1(11.887,6.147) v1(11.271,6.147)
  Top Layer w0.305: C11.2 v1(14.776,10.681)
  Top Layer w0.381: C10.2 C9.2
  Top Layer w0.4: C3.1 8.453,5.361 v1@9.137,5.361 ; C2.1@8.453,6.299 v1(9.137,6.299) ; v1(9.899,2.749) v1(9.899,3.454) ; C5.2@11.648,7.074 C1.2 ; v1(11.887,6.147) 11.897,6.137 12.665,6.137 C4.2@12.693,6.109 ; C6.2@12.693,5.08 C4.2 C4.2@12.693,6.109 ; C1.2@12.693,6.82 C4.2@12.693,6.109 ; C12.2@14.221,0.838 C12.2 14.233,0.854 14.233,1.494 v1(14.243,1.504) ; C14.2 15.675,0.838 15.676,0.84 15.676,1.717 15.705,1.745 C16.2 ; C17.2 19.278,1.717 19.684,1.717 19.877,1.523 v1(19.891,1.523) ; v1(34.072,6.5) C21.2 ; C21.2@34.103,7.194 v1(34.103,7.938)
  Bottom Layer w0.2: U1.A1 U1.A2
  Bottom Layer w0.25: v1(15.97,4.928) 16.398,4.5 16.398,4.331 U1.K1 ; U1.K9 U1.J9 U1.H9 ; U1.E9 U1.D9 ; U1.B3 U1.A3 ; U1.B4 U1.A4 ; U1.B8 U1.A8
  Bottom Layer w0.305: v1(4.091,5.763) U2.6 ; U1.M7@15.404,7.347 U1.M7@15.411,7.341
  Bottom Layer w0.4: v1(5.508,1.987) 6.552,1.987 U2.10@6.552,4.082 ; v1(5.508,2.977) C20.1@6.552,2.977 ; C23.2 C22.2
  other v1: 15.315,1.504 28.25,2.773 32.571,3.789 33.95,3.789 19.755,4.902 32.571,4.932 19.755,5.944 15.97,5.969 32.571,6.075 15.97,6.833 19.755,6.96 15.945,7.671 16.91,7.671 17.951,7.671 18.866,7.671 19.729,7.671 31.496,10.16 5.672,10.677
NetR1_1: R1.1 X1.3 | length 4
  Top Layer w0.15: X1.3@9.225,4.207 10.019,4.207 10.407,3.819 10.407,1.93 10.592,1.745 R1.1
OSC_80M: R1.2 U1.M2 | length 5
  Top Layer w0.15: R1.2@11.258,2.807 11.304,2.807 11.627,3.13 v1(11.627,3.15)
  Bottom Layer w0.17: v1(11.627,3.15) 13.302,4.825 U1.M2
SCK_MIC: J1.4 Mk1.4 | length 9.3
  Top Layer w0.305: J1.4 25.75,7.31 26.31,7.869 31.996,7.869 32.163,8.036 32.202,8.036 32.31,8.145 Mk1.4
SCL: J1.2 U2.5 | length 37.5
  Top Layer w0.203: J1.2 24.747,4.967 24.747,2.597 v1(25.475,1.87)
  Power w0.208: v1(4.114,1.707) 4.571,1.25 10.619,1.25 11.813,2.444 17.541,2.444 24.9,2.444 v1(25.475,1.87)
  Bottom Layer w0.254: v1(4.114,1.707) 2.108,1.707 0.914,2.901 0.914,6.246 1.746,7.078 3.146,7.078 3.826,6.398 U2.5
SD_MIC: J1.5 Mk1.6 | length 15.3
  Top Layer w0.305: v1(26.25,3.86) J1.5 ; Mk1.6 v1(34.072,9.084)
  Bottom Layer w0.305: v1(26.25,3.86) 25.475,4.636 25.475,7.478 25.896,7.899 32.888,7.899 v1(34.072,9.084)
SDA: J1.1 U2.2 | length 35.1
  Top Layer w0.203: v1(24.25,1.87) J1.1
  Power w0.208: v1(5.022,9.213) 5.022,4.108 3.487,2.572 3.487,1.345 3.997,0.835 10.789,0.835 11.996,2.043 23.526,2.043 23.698,1.87 v1(24.25,1.87)
  Bottom Layer w0.254: v1(5.022,9.213) 5.672,9.213 5.942,8.943 U2.2
VAREF: C13.1 U1.L1 | length 2
  Top Layer w0.25: C13.1@14.871,2.749 v1(15.917,3.797)
  Top Layer w0.4: v1(15.917,3.797) v1(15.917,3.797)
  Bottom Layer w0.25: U1.L1@15.916,4.313 15.911,4.308 15.911,4.295 15.917,4.289 v1(15.917,3.797)
VCC_OSC: C2.2 C3.2 FB2.2 X1.4 | length 3.2
  Top Layer w0.4: X1.4@7.425,4.207 7.512,4.294 C2.2 ; C2.2@7.497,6.369 FB2.2
VDD_A: C16.1 FB6.1 U1.J1 | length 1.7
  Top Layer w0.25: v1(16.91,3.581) 16.91,2.69 FB6.1@16.939,2.661
  Top Layer w0.4: C16.1 C16.1@15.876,2.678
  Bottom Layer w0.25: U1.J1 16.907,4.322 16.907,3.584 v1(16.91,3.581)
VDD_D: C17.1 FB7.1 U1.H1 | length 2.4
  Top Layer w0.25: FB7.1@18.125,2.678 v1(18.125,3.581)
  Top Layer w0.4: FB7.1@18.132,2.678 18.324,2.678 FB7.1@18.332,2.685
  Bottom Layer w0.25: U1.H1 17.411,4.318 17.411,3.94 17.769,3.581 v1(18.125,3.581)
VDD_LF: C6.1 FB4.1 U1.M3 | length 3.2
  Top Layer w0.25: C6.1@13.709,4.906 14.119,4.906 14.268,5.055 v1(14.268,5.325)
  Top Layer w0.4: FB4.1@13.633,3.848 C6.1@13.633,4.982
  Bottom Layer w0.25: v1(14.268,5.325) U1.M3
VDD_PLL: C4.1 C5.1 FB3.1 U1.M4 | length 9.6
  Top Layer w0.25: C4.1 v1(14.255,6.058) v1@14.306,6.058
  Top Layer w0.3: v1@9.137,6.987 C5.1@10.124,6.987 ; C5.1@10.077,7.37 10.077,8.003 10.204,8.13 10.491,8.13 FB3.1
  Bottom Layer w0.25: v1(14.255,6.058) 14.704,6.058 14.938,5.825 U1.M4
  Bottom Layer w0.3: v1(9.137,6.985) 13.328,6.985 v1(14.255,6.058)
VDD_RF: C8.1 C9.1 C10.1 C11.1 FB5.1 U1.F9 U1.G9 U1.M1 | length 16.1
  Top Layer w0.25: 13.106,2.642 13.716,2.642 13.87,2.796 13.87,2.879 v1(14.878,3.886) ; C8.1 C8.1@13.686,2.685 ; C10.1@17.659,9.589 17.644,9.574 17.644,9.131 v1@17.879,8.896 ; v1(18.404,8.869) 18.667,9.131 18.667,9.492 C9.1
  Top Layer w0.3: v1@17.117,8.864 17.117,9.483
  Top Layer w0.305: v1@17.879,8.896 v1(17.907,8.869) ; C9.1 C9.1
  Top Layer w0.4: FB5.1@12.541,2.661 13.106,2.661 C8.1@13.574,2.661 ; C11.1 16.364,9.589 17.011,9.589 17.659,9.589 C10.1 ; v1@17.117,8.864 v1(17.127,8.855)
  Power w0.3: v1(14.878,3.886) 14.878,8.199 15.533,8.855 v1(17.127,8.855)
  Bottom Layer w0.25: v1(14.878,3.886) 14.882,3.89 15.258,3.89 15.404,4.036 U1.M1
  Bottom Layer w0.305: U1.G9@17.907,8.327 v1(17.907,8.869) ; U1.F9 v1(18.404,8.869)
VDD_VCO: C1.1 FB1.1 U1.M6 | length 3.3
  Top Layer w0.25: C1.1@13.633,6.985 C1.1@13.633,7.041 ; C1.1@13.633,7.099 C1.1 ; C1.1@13.737,6.937 C1.1@13.633,7.041 ; v1@14.265,6.833 v1(14.319,6.833) v1@14.319,6.836 ; v1@14.319,6.887 v1@14.319,6.836 ; C1.1@13.633,7.041 C1.1 ; C1.1 13.659,7.049 14.106,7.049 v1@14.319,6.836
  Top Layer w0.4: C1.1@13.633,7.099 FB1.1
  Bottom Layer w0.25: v1(14.319,6.833) 14.327,6.825 U1.M6
WS_MIC: J1.3 Mk1.1 | length 14.4
  Top Layer w0.305: J1.3 25.25,10.363 25.89,11.003 32.787,11.003 33.132,10.658 Mk1.1
pads on no net: U1.M5 U2.3 U2.4 U2.7 U2.8 U2.9 U2.13 X1.1

## Polygon pours and split planes (outlines as drawn)
GND on Top Layer "GND_L01_P003" (solid, remove dead copper, pour order 3): 0.203,11.252 37.77,11.252 37.77,0.203 0.203,0.203
GND on Bottom Layer "GND_L04_P012" (solid, remove dead copper, pour order 12): 0.203,11.252 37.77,11.252 37.77,0.203 0.203,0.203
GND on GND "GND_L03_P014" (solid, remove dead copper, pour order 14): 0.203,11.252 37.77,11.252 37.77,0.203 0.203,0.203
GND on Power "GND_L02_P013" (solid, remove dead copper, pour order 13): 0.203,11.252 37.77,11.252 37.77,0.203 0.203,0.203

## Other copper
Top Layer:
  region net 1V8_SENSOR: 13.513,1.168 11.735,1.168 11.735,0.508 13.513,0.508
  rectangle net GND: 30.226,8.28 31.877,9.195
  rectangle net 1V8_SENSOR: 16.612,1.575 18.44,2.134
  rectangle net VDD_RF: 15.951,9.296 19.126,9.906
  region net 1V8_SENSOR: 12.217,2.083 12.217,0.584 12.852,0.584 12.852,2.083
  rectangle net VDD_RF: 12.217,2.362 13.995,3.007
  rectangle net VDD_A: 15.545,2.362 17.323,2.921
  rectangle net VDD_D: 17.805,2.362 19.583,2.921
  rectangle net GND: 30.226,8.779 32.571,10.515
  rectangle net GND: 13.99,1.504 15.905,2.037
  rectangle net GND: 13.28,1.517 16.186,2.037
Bottom Layer:
  rectangle net 3V3_SENSOR: 7.239,0.323 7.72,5.904
  rectangle net 3V3_SENSOR: 7.244,0.323 8.105,1.339
  region net GND: 6.858,0.323 6.858,4.597 6.274,4.597 6.274,0.323
  rectangle net 3V3_SENSOR: 6.362,4.917 7.72,5.904
  rectangle net 3V3_SENSOR: 7.263,0.45 8.105,1.339

## Silkscreen, mask and mechanical layers (free items; w line width, h text height)
Top Overlay:
  text "BACK OF" at 21.666,10.16 h0.97
  text "RADAR-Therm-v2.0" at 0.254,8.966 h0.86
  text "TABLET SIDE" at 19.533,8.839 h0.97
Bottom Overlay:
  text "FRONT OF TABLET SIDE" at 28.88,9.627 h1
  text "MIC Port" at 34.874,6.502 h2
Board Outline:
  the board outline again, w0.254
Mechanical 3:
  drawing of 835 lines, arcs and shapes, not listed
Fabrication:
  drawing of 295 lines, arcs and shapes, not listed
  text "Layer" at 48.999,10.617 h1.52
  text "Name" at 59.411,10.617 h1.52
  text "Material" at 83.026,10.617 h1.52
  text "Thickness" at 104.864,10.617 h1.52
  text "Constant" at 121.37,10.617 h1.52
  text "Board Layer Stack" at 135.844,10.617 h1.52
  text "Top Overlay" at 59.411,7.569 h1.52
  text "Top Solder" at 59.411,4.521 h1.52
  text "Solder Resist" at 83.026,4.521 h1.52
  text "0.39mil" at 104.864,4.521 h1.52
  text "3.3" at 121.37,4.521 h1.52
  text "1" at 48.999,1.473 h1.52
  text "Top Layer" at 59.411,1.473 h1.52
  text "1.38mil" at 104.864,1.473 h1.52
  text "Dielectric 2" at 59.411,-1.575 h1.52
  text "PP-006" at 83.026,-1.575 h1.52
  text "8.28mil" at 104.864,-1.575 h1.52
  text "4.6" at 121.37,-1.575 h1.52
  text "2" at 48.999,-4.623 h1.52
  text "Power" at 59.411,-4.623 h1.52
  text "CF-004" at 83.026,-4.623 h1.52
  text "1.38mil" at 104.864,-4.623 h1.52
  text "Dielectric 1" at 59.411,-7.671 h1.52
  text "FR-4" at 83.026,-7.671 h1.52
  text "41.93mil" at 104.864,-7.671 h1.52
  text "4.6" at 121.37,-7.671 h1.52
  text "3" at 48.999,-10.719 h1.52
  text "GND" at 59.411,-10.719 h1.52
  text "CF-004" at 83.026,-10.719 h1.52
  text "1.38mil" at 104.864,-10.719 h1.52
  text "Dielectric 3" at 59.411,-13.767 h1.52
  text "PP-006" at 83.026,-13.767 h1.52
  text "8.28mil" at 104.864,-13.767 h1.52
  text "4.6" at 121.37,-13.767 h1.52
  text "4" at 48.999,-16.815 h1.52
  text "Bottom Layer" at 59.411,-16.815 h1.52
  text "1.38mil" at 104.864,-16.815 h1.52
  text "Bottom Solder" at 59.411,-19.863 h1.52
  text "Solder Resist" at 83.026,-19.863 h1.52
  text "0.39mil" at 104.864,-19.863 h1.52
  text "3.3" at 121.37,-19.863 h1.52
  text "Bottom Overlay" at 59.411,-22.911 h1.52
  text "Total board thickness:" at 48.999,-25.959 h1.52
  text "64.80mil" at 104.864,-25.959 h1.52
Drill Drawing:
  circle w0.254: c2.429,24.837 r0.847
  lines w0.254: 1.582,27.8 3.276,27.8 3.276,29.494 1.582,29.494 1.582,27.8 ; 1.582,32.034 2.006,32.034 2.429,31.61 2.852,32.034 3.276,32.034 2.852,32.457 3.276,32.88 2.852,32.88 2.429,33.304 2.006,32.88 1.582,32.88 2.006,32.457 1.582,32.034
  lines w0.381: 0.064,22.847 177.358,22.847 ; 0.064,34.277 177.358,34.277 ; 14.056,19.037 14.056,38.087 ; 27.768,19.037 27.768,38.087 ; 55.7,19.037 55.7,38.087 ; 68.549,19.037 68.549,38.087 ; 87.188,19.037 87.188,38.087 ; 125.276,19.037 125.276,38.087 ; 140.259,19.037 140.259,38.087 ; 159.202,19.037 159.202,38.087 ; 0.064,19.037 177.358,19.037 177.358,38.087 0.064,38.087 0.064,19.037
  text "Symbol" at 2.349,35.42 h1.83
  text "Count" at 15.199,35.42 h1.83
  text "Hole Size" at 28.911,35.42 h1.83
  text "Plated" at 56.843,35.42 h1.83
  text "Hole Type" at 69.692,35.42 h1.83
  text "Drill Layer Pair" at 88.331,35.42 h1.83
  text "Via/Pad" at 126.419,35.42 h1.83
  text "Pad Shape" at 141.402,35.42 h1.83
  text "Template" at 160.345,35.42 h1.83
  text "1" at 15.199,31.61 h1.52
  text "1.025mm (40.35mil)" at 28.911,31.61 h1.52
  text "PTH" at 56.843,31.61 h1.52
  text "Round" at 69.692,31.61 h1.52
  text "Top Layer - Bottom Layer" at 88.331,31.61 h1.52
  text "Pad" at 126.419,31.61 h1.52
  text "Rounded" at 141.402,31.61 h1.52
  text "c162h102x0" at 160.345,31.61 h1.52
  text "2" at 15.199,27.8 h1.52
  text "2.000mm (78.74mil)" at 28.911,27.8 h1.52
  text "NPTH" at 56.843,27.8 h1.52
  text "Round" at 69.692,27.8 h1.52
  text "Top Layer - Bottom Layer" at 88.331,27.8 h1.52
  text "Pad" at 126.419,27.8 h1.52
  text "Rounded" at 141.402,27.8 h1.52
  text "c200hn200" at 160.345,27.8 h1.52
  text "70" at 15.199,23.99 h1.52
  text "0.300mm (11.81mil)" at 28.911,23.99 h1.52
  text "PTH" at 56.843,23.99 h1.52
  text "Round" at 69.692,23.99 h1.52
  text "Top Layer - Bottom Layer" at 88.331,23.99 h1.52
  text "Via" at 126.419,23.99 h1.52
  text "Rounded" at 141.402,23.99 h1.52
  text "v50h30" at 160.345,23.99 h1.52
  text "73 Total" at 15.199,20.18 h1.52

## Dimensions
38,11.5 to 38,0 on Dimension
0,11.5 to 38,11.5 on Dimension

## Text inside footprints (layer, text, board x,y; h text height)
J1: Top Overlay "1" at 24.059,3.145 h0.76; Top Overlay "Board Edge" at 23.895,0.426 h0.76